# Altium PCB Flex_Cable.PcbDoc
Units mil, origin at the board's own origin, x right, y up, seen from the top; angles counter-clockwise.
Board outline 255.91 x 3543.18 mil, 2 copper layers (Top Layer, Bottom Layer), stack 3.556 mil thick; 2 components, 12 nets, 24 pads, 0 vias.
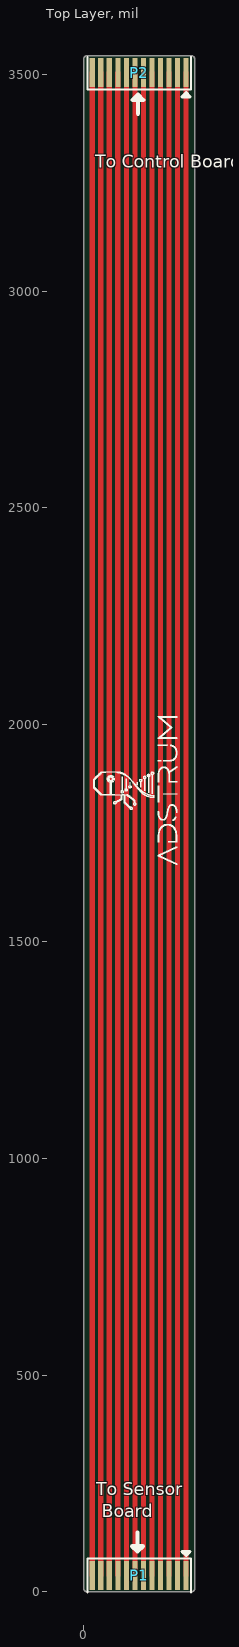
[diagram p0: Top Layer view]
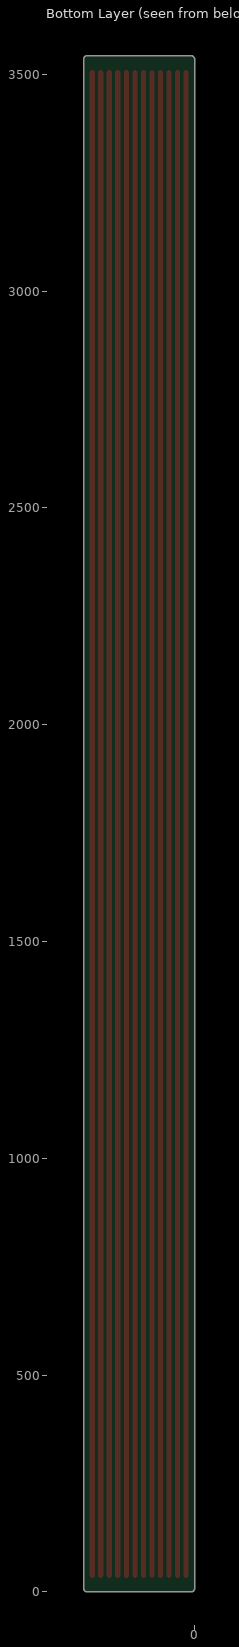
[diagram p1: Bottom Layer view, seen from below]

## Layer stack, top to bottom
Top Solder: solder mask 0.5, Solder Resist, Dk 3.5
Top Layer: signal copper 1.378
Dielectric 1: core 0.8, Polymide, Dk 4.8
Bottom Layer: signal copper 1.378
Bottom Solder: solder mask 0.5, Solder Resist, Dk 3.5

## Board outline
0,8.18 ccw(c7.87,7.87) 7.56,0 248.35,0 ccw(c248.04,7.87) 255.91,8.18 255.91,3535 ccw(c248.04,3535.31) 248.35,3543.18 7.56,3543.18 ccw(c7.87,3535.31) 0,3535

## Design rules (kind name [scope] priority, off if disabled: settings)
Clearance [All] p1: gap=7 ignorepadtopadclearanceinfootprint=FALSE except(0: Arc-Hole Track-Hole SMDPad-Hole THPad-Hole Via-Hole Fill-Hole Poly-Hole Region-Hole Text-Hole; 4: Arc-SMDPad Track-SMDPad SMDPad-SMDPad; 10: Text-Text)
PolygonConnect [All] p1: connectstyle=Relief reliefconductorwidth=10 reliefentries=4 polygonreliefangle="90 Angle" airgapwidth=10
RoutingVias [All] p1: holewidth=28 width=50 viastyle="Through Hole" minholewidth=28 minwidth=50 maxholewidth=28 maxwidth=50
SilkToSolderMaskClearance [IsPad] p1: minsilkscreentomaskgap=0 clearancetoexposedcopper=TRUE
SolderMaskExpansion [All] p1: expansion=4 istentingtop=FALSE
Width [All] p1: maxlimit=15 minlimit=10 preferedwidth=10
29 further rules are at their usual default settings.

## Components (designator, comment, footprint, x,y, rotation, side; value= is the part's Value field where it differs from the comment)
P1 "12 Pin Ribbon Pads" "12 Pin Ribbon Pads" 236.11,38 r0 top locked
P2 "12 Pin Ribbon Pads" "12 Pin Ribbon Pads" 236.11,3504 r0 top

## Footprints (in the part's own frame and the unit in brackets; to place one, negate y for a bottom-side part, rotate by r counter-clockwise, add the part's x,y. Pads: shape width x height; smd on the part's side, far side on the other; paste and mask are expansions set on the pad)
"12 Pin Ribbon Pads" [mm]
  rect 0.3x1.7 smd: 1(0,0) 2(-0.5,0) 3(-1,0) 4(-1.5,0) 5(-2,0) 6(-2.5,0) 7(-3,0) 8(-3.5,0) 9(-4,0) 10(-4.5,0) 11(-5,0) 12(-5.5,0)
  silkscreen extent -5.78,-0.99 0.28,1.4

## Part data
P1 P2: "Ribbon wire Connection Pads"

## Nets (pads, with @x,y where several pads share a name; then routed paths per layer and width w, separated by ;. In a path a pad name is that pad's centre, name@x,y a point inside that pad or via, vN(x,y) a via of type N, cw(c..) or ccw(c..) an arc to the next point about the centre after c; other vN are vias at no path point)
GND: P1.12 P2.12 | length 3466
  Top Layer w12: P1.12 P2.12
SENSOR1: P1.1 P2.1 | length 3466
  Top Layer w12: P1.1 P2.1
SENSOR2: P1.2 P2.2 | length 3466
  Top Layer w12: P1.2 P2.2
SENSOR3: P1.3 P2.3 | length 3466
  Top Layer w12: P1.3 P2.3
SENSOR4: P1.4 P2.4 | length 3466
  Top Layer w12: P1.4 P2.4
SENSOR5: P1.5 P2.5 | length 3466
  Top Layer w12: P1.5 P2.5
SENSOR6: P1.6 P2.6 | length 3466
  Top Layer w12: P1.6 P2.6
SENSOR7: P1.7 P2.7 | length 3466
  Top Layer w12: P1.7 P2.7
SENSOR8: P1.8 P2.8 | length 3466
  Top Layer w12: P1.8 P2.8
SW1: P1.9 P2.9 | length 3466
  Top Layer w12: P1.9 P2.9
SW2: P1.10 P2.10 | length 3466
  Top Layer w12: P1.10 P2.10
VCC_3V3: P1.11 P2.11 | length 3466
  Top Layer w12: P1.11 P2.11

## Silkscreen, mask and mechanical layers (free items; w line width, h text height)
Top Overlay:
  drawing of 2576 lines, arcs and shapes, not listed
  text "To Control Board" at 27,3274 h50
  text "To Sensor /  Board" at 29,162 h50
Mechanical 1:
  text "Stiffener Area" at -959,3401 h60
  text "Note:" at -1198,599 h60
  text "Stiffener must be Off" at -1201,509 h60
  text "4mm and on Bottom" at -1203,424 h60
  text "side of PCB." at -1198,351 h60
  text "Stiffener Area" at -955,95 h60
Mechanical 2:
  the board outline again, w10
Drill Drawing:
  drawing of 1352 lines, arcs and shapes, not listed
  text "Layer" at 10828.49,62658.65 h60
  text "Name" at 11238.41,62658.65 h60
  text "Material" at 12168.15,62658.65 h60
  text "Thickness" at 13027.92,62658.65 h60
  text "Constant" at 13677.75,62658.65 h60
  text "Board Layer Stack" at 14247.62,62658.65 h60
  text "Top Overlay" at 11238.41,62538.65 h60
  text "Top Solder" at 11238.41,62418.65 h60
  text "Solder Resist" at 12168.15,62418.65 h60
  text "0.50mil" at 13027.92,62418.65 h60
  text "3.5" at 13677.75,62418.65 h60
  text "1" at 10828.49,62298.65 h60
  text "Top Layer" at 11238.41,62298.65 h60
  text "CF-005" at 12168.15,62298.65 h60
  text "1.38mil" at 13027.92,62298.65 h60
  text "Dielectric 1" at 11238.41,62178.65 h60
  text "Polymide" at 12168.15,62178.65 h60
  text "0.80mil" at 13027.92,62178.65 h60
  text "4.8" at 13677.75,62178.65 h60
  text "2" at 10828.49,62058.65 h60
  text "Bottom Layer" at 11238.41,62058.65 h60
  text "CF-005" at 12168.15,62058.65 h60
  text "1.38mil" at 13027.92,62058.65 h60
  text "Bottom Solder" at 11238.41,61938.65 h60
  text "Solder Resist" at 12168.15,61938.65 h60
  text "0.50mil" at 13027.92,61938.65 h60
  text "3.5" at 13677.75,61938.65 h60
  text "Bottom Overlay" at 11238.41,61818.65 h60
  text "Symbol" at 806.5,3513.5 h72
  text "Count" at 1312.38,3513.5 h72
  text "Hole Size" at 1746.27,3513.5 h72
  text "Plated" at 2468.08,3513.5 h72
  text "Hole Type" at 2973.96,3513.5 h72
  text "Drill Layer Pair" at 3707.76,3513.5 h72
  text "Via/Pad" at 4897.41,3513.5 h72
  text "Pad Shape" at 5487.26,3513.5 h72
  text "Template" at 6233.06,3513.5 h72
  text "Description" at 6882.89,3513.5 h72
  text "Hole Tolerance (+)" at 7736.65,3513.5 h72
  text "Hole Tolerance (-)" at 9070.26,3513.5 h72

## Dimensions
248.35,-1.18 to 0,156 on Mechanical 1
248.35,3543.18 to 0,3386 on Mechanical 1
8.57,3465 to 247.11,3465 on Mechanical 1
8.57,3540 to 8.57,3465 on Mechanical 1
255.91,8.18 to 0,8.18 on Mechanical 1
248.35,3543.18 to 248.35,0 on Mechanical 1